# Allegro board 980K2-260817_261117.brd
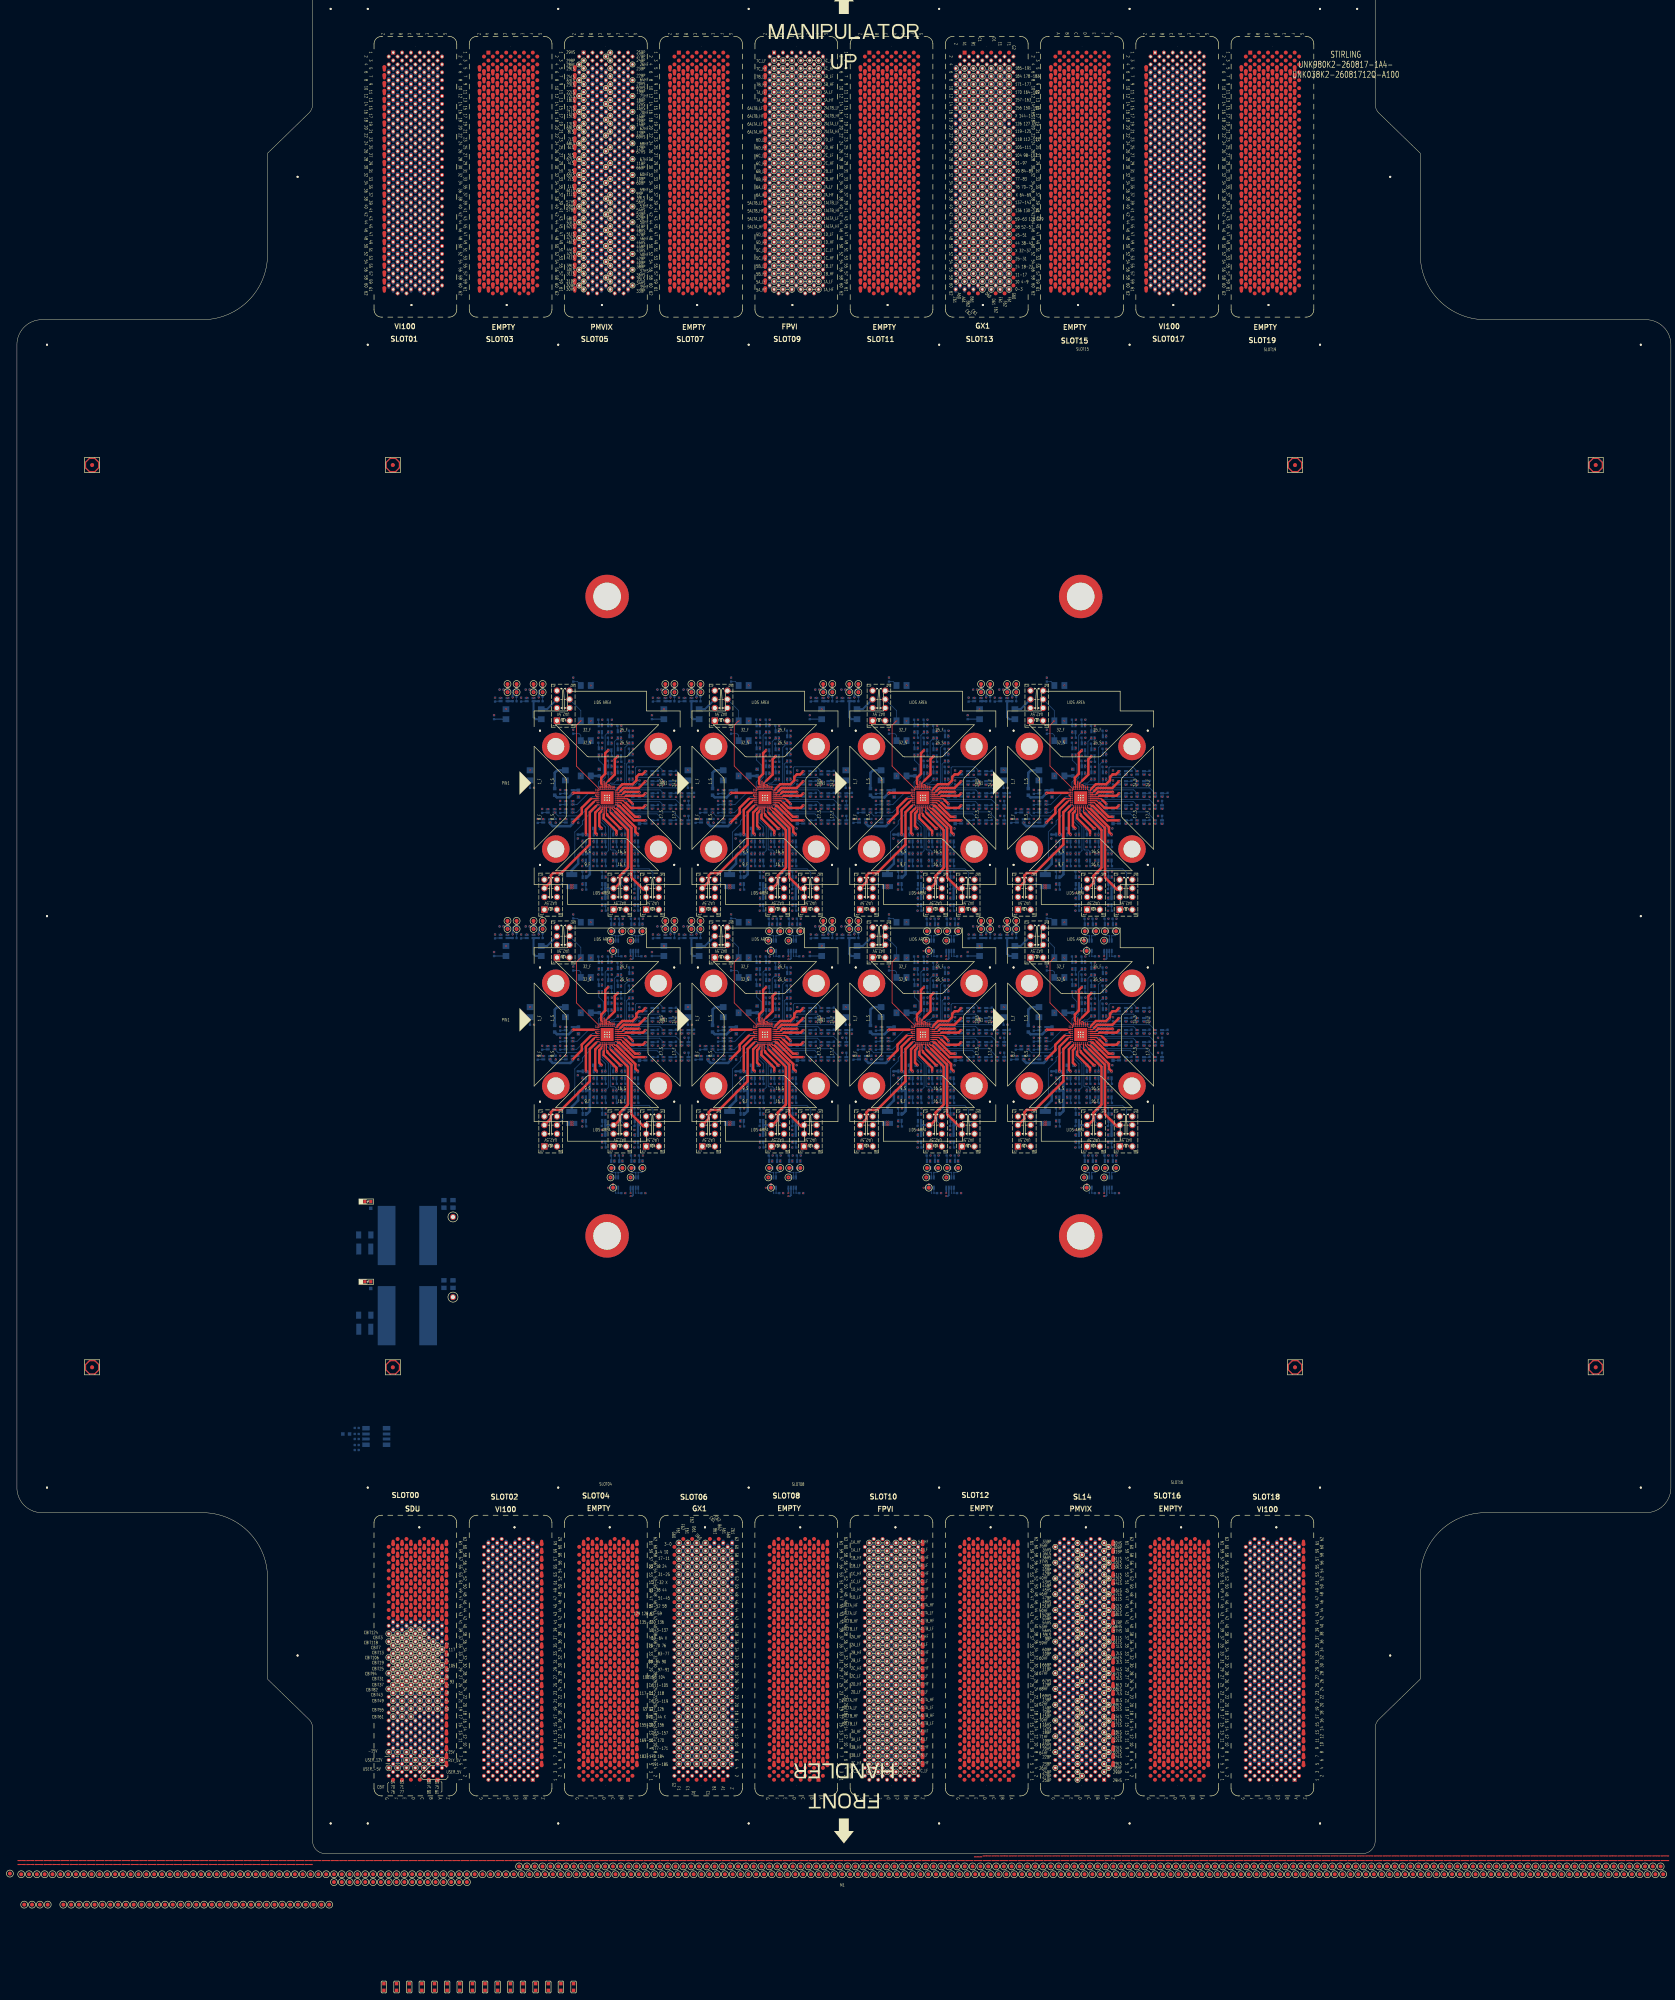
[diagram p0: board, top side]
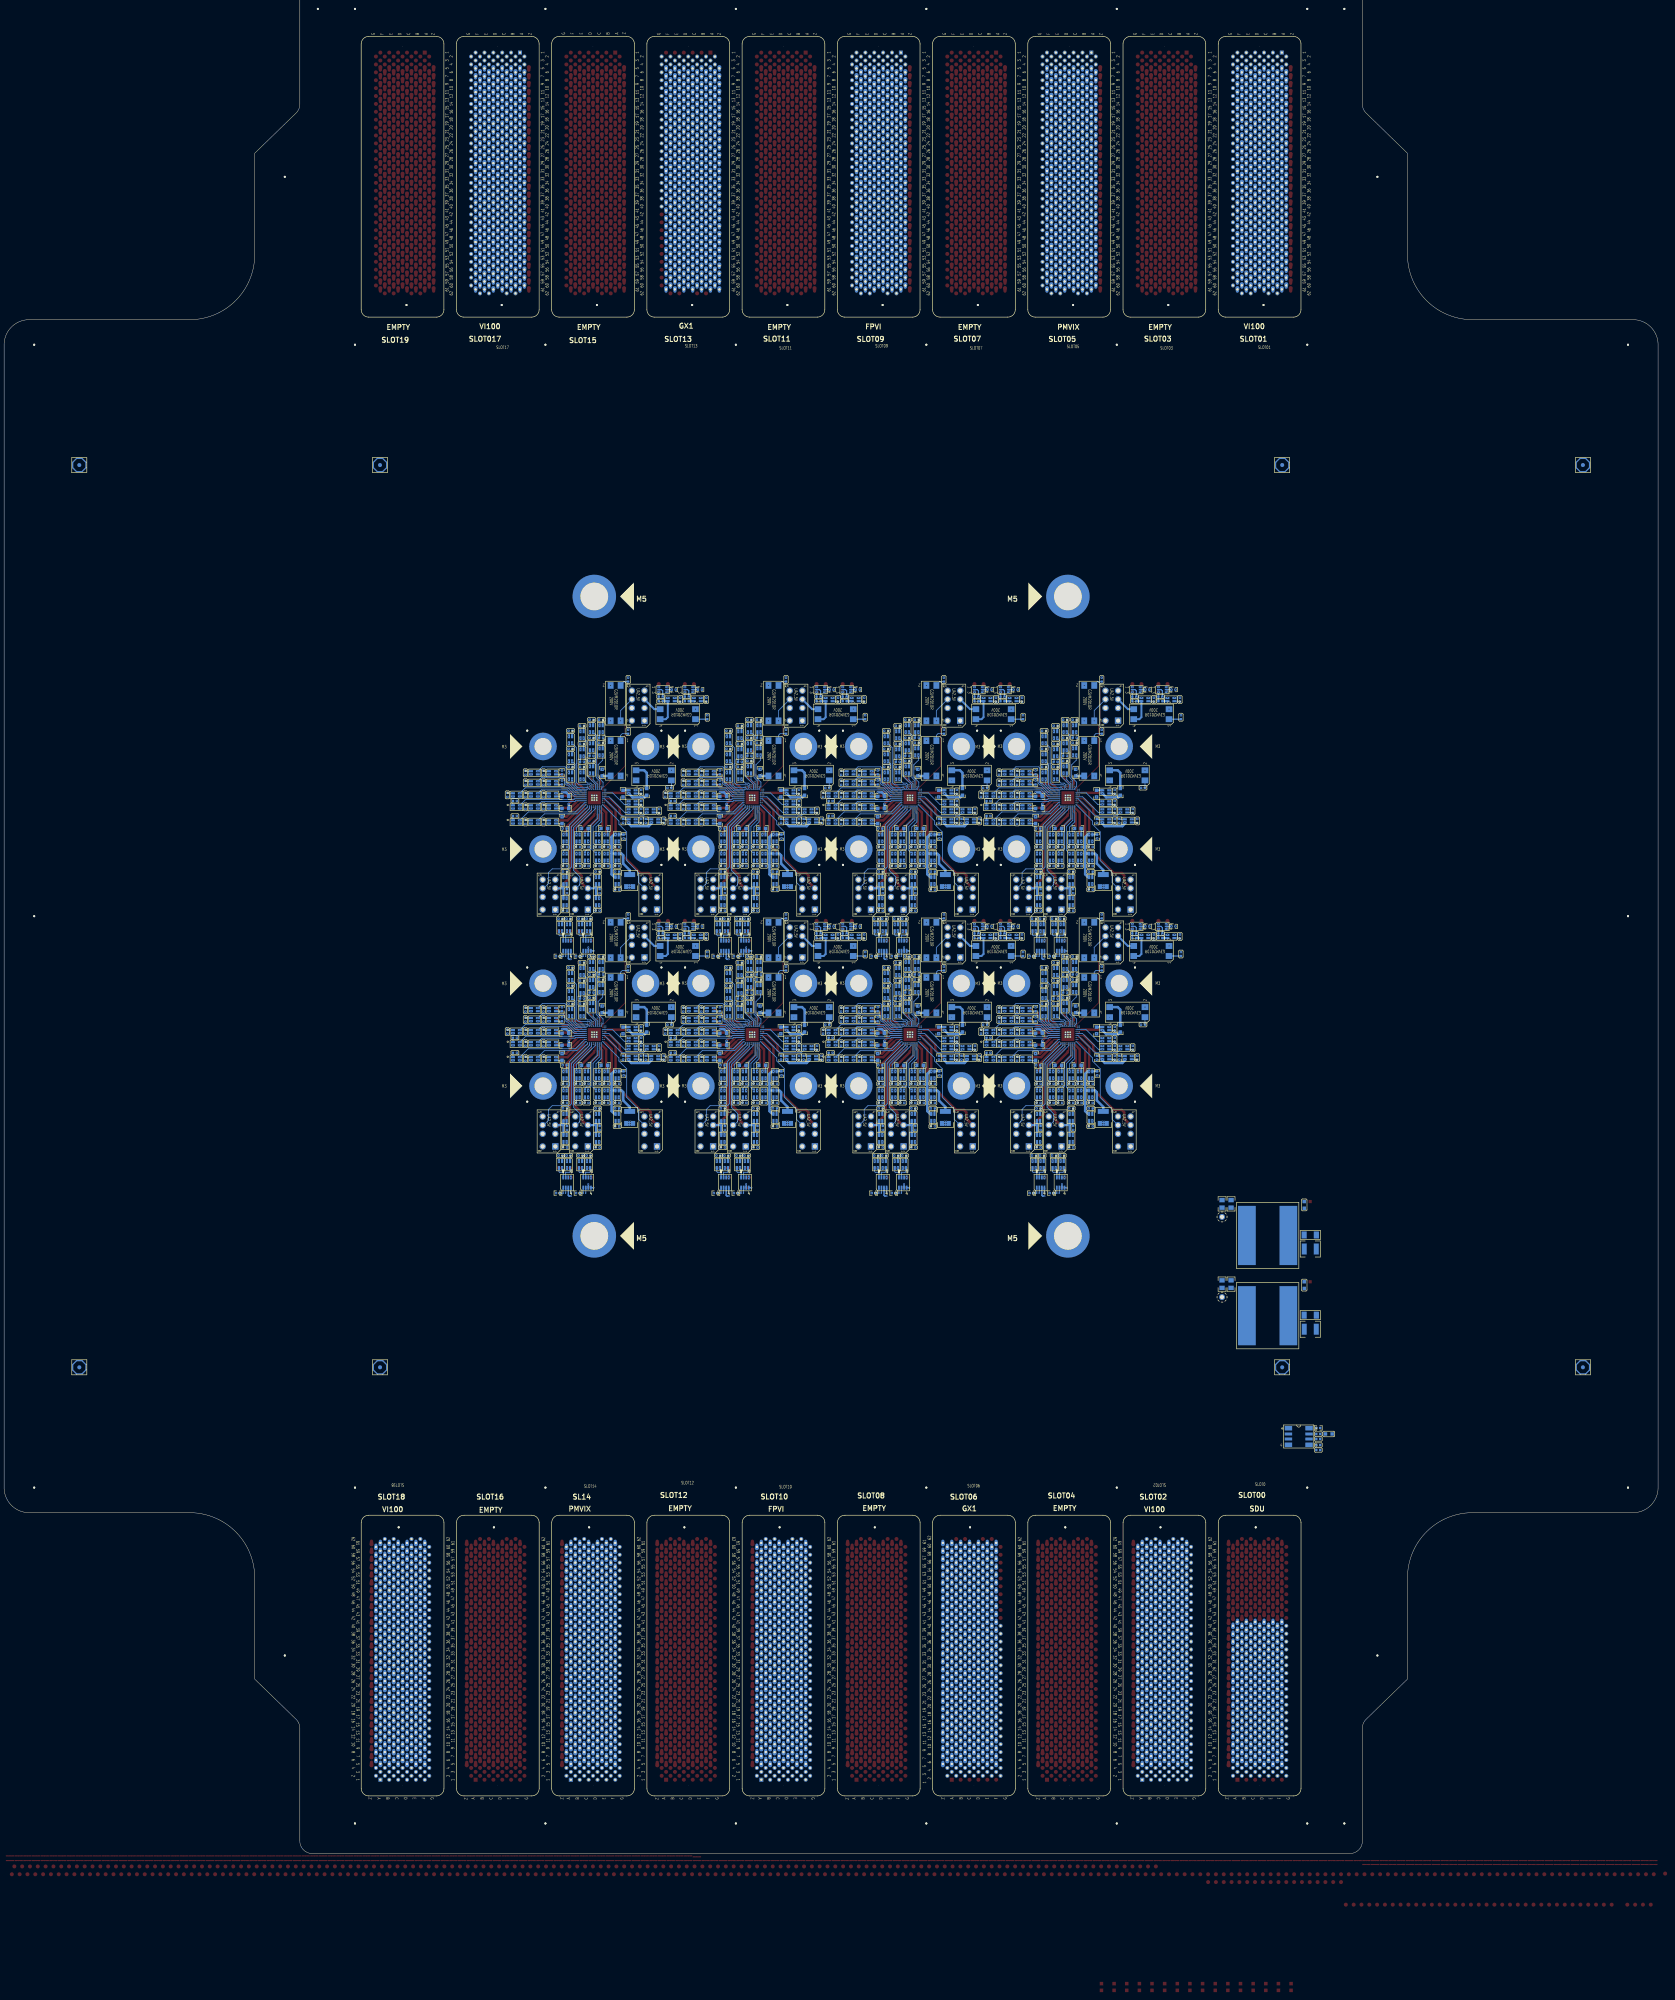
[diagram p1: board, bottom side, seen from below]

Outline 419.1 x 474.98 mm; copper layers: TOP, L02_GND, L03_DP, L04_GND, L05_DP, L06_GND, L07_VI, L08_GND, L09_VI, L10_GND, L11_VI, L12_GND, L13_VI, L14_GND, L15_5V, L16_5V, L17_C-BIT, L18_C-BIT, L19_GND, L20_VI, L21_GND, L22_VI, L23_GND, L24_VI, L25_GND, L26_VI, L27_GND, L28_DP, L29_GND, L30_DP, L31_GND, BOTTOM. Coordinates in mm from the lower left corner of the outline.

## Placement (name value [footprint] x y rotation side)
BC9  0.1U-50-X-S4-TDK  [C0402]  86.11 107.82 180 bottom
BR5  1K-1-S4  [R0402]  86.11 106.3 0 bottom
BR6  1K-1-S4  [R0402]  86.11 103.5 0 bottom
BR7  0-5-S6  [R0603]  83.44 106.3 180 bottom
BR8  0-5-S4  [R0402]  86.11 105.03 180 bottom
BR9  0-5-S4  [R0402]  86.11 102.24 180 bottom
BU1  AT24C512C-SSHM-T-SOIC8  [SO8_206X127MM]  91.06 105.66 180 bottom
C48  0.01U-100-X7R-S6-MU  [C0603]  147.57 273.87 90 bottom
C49  0.01U-100-X7R-S6-MU  [C0603]  136.27 268.99 270 bottom
C50  0.01U-100-X7R-S6-MU  [C0603]  142.28 268.54 270 bottom
C53  1U-16-X5R-S4-YA  [C0402]  142.24 261.62 270 bottom
C54  2.2U-16-X-S4-MU  [C0402]  136.53 261.62 270 bottom
C58  1U-16-X5R-S4-YA  [C0402]  142.11 257.68 270 bottom
C59  4.7U-100-X-SB-MU  [C1210]  140.59 246.51 270 bottom
C60  0.01U-100-X7R-S6-MU  [C0603]  147.01 259.72 0 bottom
C61  0.01U-100-X7R-S6-MU  [C0603]  156.88 264.78 180 bottom
C62  2.2U-16-X-S4-MU  [C0402]  157.07 259.72 0 bottom
C63  0.01U-100-X7R-S6-MU  [C0603]  157.73 261.82 90 bottom
C64  0.01U-100-X7R-S6-MU  [C0603]  156.88 267.82 180 bottom
C65  0.1U-25-X7R-S4-MU  [C0402]  157.73 271.37 90 bottom
C66  0.1U-25-X7R-S4-MU  [C0402]  152.65 276.61 180 bottom
C67  0.1U-25-X7R-S4-MU  [C0402]  150.24 278.13 180 bottom
C68  0.1U-25-X7R-S4-MU  [C0402]  147.83 282.7 180 bottom
C69  0.01U-100-X7R-S6-MU  [C0603]  151.96 259.72 0 bottom
C70  0.1U-25-X7R-S4-MU  [C0402]  122.8 294.89 180 bottom
C71  0.1U-25-X7R-S4-MU  [C0402]  129.42 294.89 180 bottom
C72  0.1U-25-X7R-S4-MU  [C0402]  158.75 227.33 0 bottom
C73  0.1U-25-X7R-S4-MU  [C0402]  153.67 227.33 0 bottom
C74  0.1U-25-X7R-S4-MU  [C0402]  157.73 273.91 90 bottom
CT1  47U-16-X5R-SB-MU  [C1210]  88.14 153.16 180 bottom
CT2  10U-16-X5R-S8-TY  [C0805]  108.2 164.59 90 bottom
CT3  22U-16-X-S8-MU  [C0805]  110.49 164.59 90 bottom
CT7  47U-16-X5R-SB-MU  [C1210]  88.14 132.84 180 bottom
CT8  10U-16-X5R-S8-TY  [C0805]  110.49 144.27 90 bottom
CT9  22U-16-X-S8-MU  [C0805]  108.2 144.27 90 bottom
F1  C1F8-0.25A-SA  [FUSE_1206_H1P05MM]  88.14 156.72 0 bottom
F2  C1F8-0.25A-SA  [FUSE_1206_H1P05MM]  88.14 136.4 0 bottom
FD1  -  [FD_040_V2]  95.25 123.19 0 top
FD2  -  [FD_040_V2]  323.85 123.19 0 top
FD3  -  [FD_040_V2]  323.85 351.79 0 top
FD4  -  [FD_040_V2]  95.25 351.79 0 top
FD5  -  [FD_040_V2]  323.85 123.19 180 bottom
FD6  -  [FD_040_V2]  95.25 123.19 180 bottom
FD7  -  [FD_040_V2]  95.25 351.79 180 bottom
FD8  -  [FD_040_V2]  323.85 351.79 180 bottom
FD9  -  [FD_040_V2]  19.05 123.19 0 top
FD10  -  [FD_040_V2]  400.05 123.19 0 top
FD11  -  [FD_040_V2]  400.05 351.79 0 top
FD12  -  [FD_040_V2]  19.05 351.79 0 top
FD13  -  [FD_040_V2]  400.05 123.19 180 bottom
FD14  -  [FD_040_V2]  19.05 123.19 180 bottom
FD15  -  [FD_040_V2]  19.05 351.79 180 bottom
FD16  -  [FD_040_V2]  400.05 351.79 180 bottom
K1  UA2-5NJ-A-V3  [RL_NECUA2_5V_V3]  138.43 290.63 270 bottom
K2  G3VM-201DR  [RL_G3VM201DR_200V]  144.15 277.5 0 bottom
K3  G3VM-201DR  [RL_G3VM201DR_200V]  134.49 273.18 90 bottom
K4  G3VM-201DR  [RL_G3VM201DR_200V]  144.15 291.47 0 bottom
K5  G3VM-51UR-5V-VSON4  [RL_G3VM_4P_VSON4]  139.95 268.99 0 bottom
K6  G3VM-51UR-5V-VSON4  [RL_G3VM_4P_VSON4]  139.95 266.19 0 bottom
K7  G3VM-51UR-5V-VSON4  [RL_G3VM_4P_VSON4]  139.95 264.16 0 bottom
K8  G3VM-51UR-5V-VSON4  [RL_G3VM_4P_VSON4]  139.95 261.62 0 bottom
K9  G3VM-51UR-5V-VSON4  [RL_G3VM_4P_VSON4]  134.24 261.62 0 bottom
K10  G3VM-51UR-5V-VSON4  [RL_G3VM_4P_VSON4]  135.38 264.16 0 bottom
K11  G3VM-51UR-5V-VSON4  [RL_G3VM_4P_VSON4]  143.76 257.3 90 bottom
K12  G3VM-51UR-5V-VSON4  [RL_G3VM_4P_VSON4]  143.76 252.48 90 bottom
K13  G3VM-51UR-5V-VSON4  [RL_G3VM_4P_VSON4]  143.76 246.51 90 bottom
K14  G3VM-51UR-5V-VSON4  [RL_G3VM_4P_VSON4]  146.56 252.48 90 bottom
K15  UA2-5NJ-A-V3  [RL_NECUA2_5V_V3]  135.25 242.75 270 bottom
K16  G3VM-51UR-5V-VSON4  [RL_G3VM_4P_VSON4]  146.56 257.3 90 bottom
K17  G3VM-51UR-5V-VSON4  [RL_G3VM_4P_VSON4]  148.72 257.3 90 bottom
K18  G3VM-51UR-5V-VSON4  [RL_G3VM_4P_VSON4]  148.72 252.48 90 bottom
K19  G3VM-51UR-5V-VSON4  [RL_G3VM_4P_VSON4]  151.51 257.3 90 bottom
K20  G3VM-51UR-5V-VSON4  [RL_G3VM_4P_VSON4]  151.51 252.48 90 bottom
K21  G3VM-51UR-5V-VSON4  [RL_G3VM_4P_VSON4]  153.67 257.3 90 bottom
K22  G3VM-51UR-5V-VSON4  [RL_G3VM_4P_VSON4]  153.67 252.48 90 bottom
K23  UA2-5NJ-A-V3  [RL_NECUA2_5V_V3]  152.78 242.75 270 bottom
K24  UA2-5NJ-A-V3  [RL_NECUA2_5V_V3]  161.04 242.75 270 bottom
K25  G3VM-51UR-5V-VSON4  [RL_G3VM_4P_VSON4]  156.97 257.3 90 bottom
K26  G3VM-51UR-5V-VSON4  [RL_G3VM_4P_VSON4]  156.97 252.48 90 bottom
K27  G3VM-51UR-5V-VSON4  [RL_G3VM_4P_VSON4]  160.15 261.37 180 bottom
K28  G3VM-51UR-5V-VSON4  [RL_G3VM_4P_VSON4]  164.72 261.37 180 bottom
K29  G3VM-51UR-5V-VSON4  [RL_G3VM_4P_VSON4]  169.29 261.37 180 bottom
K30  G3VM-51UR-5V-VSON4  [RL_G3VM_4P_VSON4]  160.15 265.18 180 bottom
K31  G3VM-51UR-5V-VSON4  [RL_G3VM_4P_VSON4]  164.72 265.18 180 bottom
K32  G3VM-51UR-5V-VSON4  [RL_G3VM_4P_VSON4]  169.29 265.18 180 bottom
K33  G3VM-51UR-5V-VSON4  [RL_G3VM_4P_VSON4]  160.15 268.22 180 bottom
K34  G3VM-51UR-5V-VSON4  [RL_G3VM_4P_VSON4]  164.72 268.22 180 bottom
K35  G3VM-51UR-5V-VSON4  [RL_G3VM_4P_VSON4]  169.29 268.22 180 bottom
K36  G3VM-51UR-5V-VSON4  [RL_G3VM_4P_VSON4]  160.15 271.27 180 bottom
K37  G3VM-51UR-5V-VSON4  [RL_G3VM_4P_VSON4]  164.72 271.27 180 bottom
K38  G3VM-51UR-5V-VSON4  [RL_G3VM_4P_VSON4]  160.15 273.81 180 bottom
K39  G3VM-51UR-5V-VSON4  [RL_G3VM_4P_VSON4]  164.72 273.81 180 bottom
K40  G3VM-51UR-5V-VSON4  [RL_G3VM_4P_VSON4]  155.58 273.05 270 bottom
K41  G3VM-51UR-5V-VSON4  [RL_G3VM_4P_VSON4]  155.58 277.62 270 bottom
K42  G3VM-51UR-5V-VSON4  [RL_G3VM_4P_VSON4]  155.58 282.19 270 bottom
K43  G3VM-51UR-5V-VSON4  [RL_G3VM_4P_VSON4]  152.65 273.05 270 bottom
K44  G3VM-51UR-5V-VSON4  [RL_G3VM_4P_VSON4]  152.65 278.89 270 bottom
K45  G3VM-51UR-5V-VSON4  [RL_G3VM_4P_VSON4]  152.65 283.46 270 bottom
K46  G3VM-51UR-5V-VSON4  [RL_G3VM_4P_VSON4]  150.24 274.57 270 bottom
K47  G3VM-51UR-5V-VSON4  [RL_G3VM_4P_VSON4]  150.24 280.42 270 bottom
K48  G3VM-51UR-5V-VSON4  [RL_G3VM_4P_VSON4]  150.24 284.99 270 bottom
K49  G3VM-51UR-5V-VSON4  [RL_G3VM_4P_VSON4]  147.83 284.99 270 bottom
K50  G3VM-51UR-5V-VSON4  [RL_G3VM_4P_VSON4]  147.83 279.15 270 bottom
K51  G3VM-51UR-5V-VSON4  [RL_G3VM_4P_VSON4]  148.72 246.51 270 bottom
K52  G3VM-51UR-5V-VSON4  [RL_G3VM_4P_VSON4]  148.72 241.17 90 bottom
K53  G3VM-51UR-5V-VSON4  [RL_G3VM_4P_VSON4]  156.97 246.51 270 bottom
K54  G3VM-51UR-5V-VSON4  [RL_G3VM_4P_VSON4]  156.97 241.17 90 bottom
K55  G3VM-51UR-5V-VSON4  [RL_G3VM_4P_VSON4]  123.44 292.35 0 bottom
K56  G3VM-201DR  [RL_G3VM201DR_200V]  128.4 288.67 90 bottom
K57  G3VM-51UR-5V-VSON4  [RL_G3VM_4P_VSON4]  158.12 234.57 270 bottom
K58  G3VM-51UR-5V-VSON4  [RL_G3VM_4P_VSON4]  156.08 234.57 270 bottom
K59  G3VM-51UR-5V-VSON4  [RL_G3VM_4P_VSON4]  153.04 234.57 270 bottom
K60  G3VM-51UR-5V-VSON4  [RL_G3VM_4P_VSON4]  151 234.57 270 bottom
K61  G3VM-51UR-5V-VSON4  [RL_G3VM_4P_VSON4]  130.05 292.35 0 bottom
LD1  LDG-2-S6  [LED_0603]  88.91 165.19 0 top
LD3  LDG-2-S6  [LED_0603]  88.91 144.87 0 top
LT1  L10U-16A-S16.5X15.5-PU  [IND_16P5X15P5MM]  98.93 156.59 0 bottom
LT3  L10U-16A-S16.5X15.5-PU  [IND_16P5X15P5MM]  98.93 136.27 0 bottom
M1  PG_LTXDX_F_X1_OUTLINE_TD_V2  [PG_LTXDX_F_X1_OUTLINE_TD_COHU]  209.55 237.49 0 top
NOREF  -  []  221.55 262.57 90 top
NOREF#2  -  []  175.84 262.57 90 top
NOREF#3  -  []  276.52 216.55 0 top
NOREF#4  -  []  267.45 269.24 0 top
NOREF#5  -  []  89.74 135.6 90 top
NOREF#6  -  []  138.56 246.51 0 top
NOREF#7  -  []  229.72 215.77 0 top
NOREF#8  -  []  186.16 272.17 90 top
NOREF#9  -  []  209.52 207.27 90 top
NOREF#10  -  []  293.99 17.15 90 top
NOREF#11  -  []  168.54 265.9 0 top
NOREF#12  -  []  89.76 164.74 90 top
NOREF#13  -  []  147.12 276.42 0 top
NOREF#14  -  []  240.23 176.17 90 top
NOREF#15  -  []  236.7 193.03 90 top
NOREF#16  -  []  130.92 291.95 90 top
NOREF#17  -  []  248.54 262.09 0 top
NOREF#18  -  []  244.44 232.28 90 top
NOREF#19  -  []  161.75 266.13 0 top
NOREF#20  -  []  229.84 224.11 90 top
NOREF#21  -  []  204.32 291.95 90 top
NOREF#22  -  []  156.57 182.05 0 top
NOREF#23  -  []  186.83 191.93 0 top
NOREF#24  -  []  260.59 244.98 90 top
NOREF#25  -  []  159.4 208.95 0 top
NOREF#26  -  []  153.76 195.7 90 top
NOREF#27  -  []  266.83 256.75 0 top
NOREF#28  -  []  191.24 253.03 90 top
NOREF#29  -  []  260.83 208.59 90 top
NOREF#30  -  []  196.02 197.6 0 top
NOREF#31  -  []  189.84 279.54 90 top
NOREF#32  -  []  272.13 284.66 0 top
NOREF#33  -  []  142.88 273.02 0 top
NOREF#34  -  []  178.35 271.84 0 top
NOREF#35  -  []  248.42 268.62 0 top
NOREF#36  -  []  209.55 237.49 90 top
NOREF#37  -  []  163.84 213.41 90 top
NOREF#38  -  []  230.41 168.7 90 top
NOREF#39  -  []  191.95 238.07 0 top
NOREF#40  -  []  283.84 267.82 90 top
NOREF#41  -  []  229.72 286.19 0 top
NOREF#42  -  []  234.39 222.02 90 top
NOREF#43  -  []  243.84 270.87 90 top
NOREF#44  -  []  199.4 264.45 90 top
NOREF#45  -  []  229.12 180.3 90 top
NOREF#46  -  []  255.84 262.57 90 top
NOREF#47  -  []  229.55 188.99 90 top
NOREF#48  -  []  283.97 270.55 90 top
NOREF#49  -  []  188.78 222.65 0 top
NOREF#50  -  []  150.77 223.79 90 top
NOREF#51  -  []  239.27 271.67 0 top
NOREF#52  -  []  260.83 263.76 90 top
NOREF#53  -  []  157.37 191.6 90 top
NOREF#54  -  []  216.55 194.49 90 top
NOREF#55  -  []  264.04 245.96 0 top
NOREF#56  -  []  203.84 270.87 90 top
NOREF#57  -  []  213.65 239.15 0 top
NOREF#58  -  []  133.1 237.5 0 top
NOREF#59  -  []  264.16 251.6 90 top
NOREF#60  -  []  275.92 250.88 90 top
NOREF#61  -  []  216.83 227.03 0 top
NOREF#62  -  []  231.11 260.17 90 top
NOREF#63  -  []  159.4 202.09 0 top
NOREF#64  -  []  204.95 200.42 90 top
NOREF#65  -  []  133.45 244.35 0 top
NOREF#66  -  []  249.49 220.89 0 top
NOREF#67  -  []  271.98 280.75 90 top
NOREF#68  -  []  148.78 222.65 0 top
NOREF#69  -  []  155.05 218.82 0 top
NOREF#70  -  []  231.24 253.03 90 top
NOREF#71  -  []  163.84 265.58 0 top
NOREF#72  -  []  187.77 197.6 0 top
NOREF#73  -  []  179.55 294.49 0 top
NOREF#74  -  []  177.29 247.78 0 top
NOREF#75  -  []  197.25 196.75 0 top
NOREF#76  -  []  187.3 286.19 0 top
NOREF#77  -  []  142.81 252.5 0 top
NOREF#78  -  []  229.84 284.11 90 top
NOREF#79  -  []  279.4 208.95 0 top
NOREF#80  -  []  235.68 173.69 90 top
NOREF#81  -  []  205.04 293.3 90 top
NOREF#82  -  []  190.41 228.7 90 top
NOREF#83  -  []  241.75 209.17 0 top
NOREF#84  -  []  237.25 196.75 0 top
NOREF#85  -  []  236.45 187.71 0 top
NOREF#86  -  []  224.04 191.93 0 top
NOREF#87  -  []  279.4 204.45 90 top
NOREF#88  -  []  236.57 193.35 0 top
NOREF#89  -  []  227.8 269.99 0 top
NOREF#90  -  []  237.59 235.77 0 top
NOREF#91  -  []  188.44 257.85 90 top
NOREF#92  -  []  226.16 260.17 90 top
NOREF#93  -  []  149.84 224.11 90 top
NOREF#94  -  []  264.16 185.63 90 top
NOREF#95  -  []  179.08 265.79 0 top
NOREF#96  -  []  89.74 135.6 0 top
NOREF#97  -  []  202.2 238.35 0 top
NOREF#98  -  []  239.27 210.87 90 top
NOREF#99  -  []  148.78 244.35 0 top
NOREF#100  -  []  162.57 291.95 0 top
NOREF#101  -  []  186.43 282.49 90 top
NOREF#102  -  []  228.95 266.89 0 top
NOREF#103  -  []  255.11 201.22 90 top
NOREF#104  -  []  233.18 217.69 90 top
NOREF#105  -  []  152.13 220.09 0 top
NOREF#106  -  []  187.77 192.78 0 top
NOREF#107  -  []  188.81 195.7 90 top
NOREF#108  -  []  290.89 202.32 0 top
NOREF#109  -  []  164.95 264.23 90 top
NOREF#110  -  []  239.72 219.22 90 top
NOREF#111  -  []  243.92 289.94 0 top
NOREF#112  -  []  226.16 212.17 90 top
NOREF#113  -  []  106.68 148.34 0 top
NOREF#114  -  []  197.5 245.31 90 top
NOREF#115  -  []  153.6 222.39 0 top
NOREF#116  -  []  184.16 185.63 90 top
NOREF#117  -  []  209.49 280.89 0 top
NOREF#118  -  []  206.32 266.13 0 top
NOREF#119  -  []  235.17 281.32 90 top
NOREF#120  -  []  152.13 224.66 0 top
NOREF#121  -  []  288.42 204.78 90 top
NOREF#122  -  []  163.97 205.9 0 top
NOREF#123  -  []  225.61 257.6 0 top
NOREF#124  -  []  149.29 279.37 0 top
NOREF#125  -  []  271.53 173.37 90 top
NOREF#126  -  []  119.48 456.29 90 top
NOREF#127  -  []  276.33 227.9 90 top
NOREF#128  -  []  129.17 291.95 0 top
NOREF#129  -  []  268.81 250.88 90 top
NOREF#130  -  []  135.15 268.04 90 top
NOREF#131  -  []  232.72 197.6 0 top
NOREF#132  -  []  195.05 278.82 0 top
NOREF#133  -  []  183.36 253.35 0 top
NOREF#134  -  []  203.84 210.87 90 top
NOREF#135  -  []  258.35 267.01 0 top
NOREF#136  -  []  267.99 178.35 0 top
NOREF#137  -  []  209.52 270.32 90 top
NOREF#138  -  []  236.33 227.9 90 top
NOREF#139  -  []  196.81 172.54 0 top
NOREF#140  -  []  159.27 271.67 0 top
NOREF#141  -  []  266.16 258.18 0 top
NOREF#142  -  []  201.75 212.22 0 top
NOREF#143  -  []  248.54 200.64 90 top
NOREF#144  -  []  140.83 203.76 90 top
NOREF#145  -  []  220.83 201.22 90 top
NOREF#146  -  []  243.84 208.62 0 top
NOREF#147  -  []  318.12 17.15 0 top
NOREF#148  -  []  279.65 272.56 0 top
NOREF#149  -  []  216.38 264.09 90 top
NOREF#150  -  []  194.39 222.02 90 top
NOREF#151  -  []  273.94 256.75 0 top
NOREF#152  -  []  270.56 192.78 0 top
NOREF#153  -  []  173.36 261.22 0 top
NOREF#154  -  []  184.04 245.96 0 top
NOREF#155  -  []  147.99 178.35 0 top
NOREF#156  -  []  219.08 205.79 0 top
NOREF#157  -  []  257.25 236.5 90 top
NOREF#158  -  []  131.22 294.89 90 top
NOREF#159  -  []  89.76 165.64 0 top
NOREF#160  -  []  156.81 232.54 0 top
NOREF#161  -  []  174.34 82.65 0 top
NOREF#162  -  []  266.16 226.14 90 top
NOREF#163  -  []  193.95 191.93 0 top
NOREF#164  -  []  243.97 270.55 90 top
NOREF#165  -  []  150.56 192.78 0 top
NOREF#166  -  []  136.55 254.49 90 top
NOREF#167  -  []  174.07 210.89 90 top
NOREF#168  -  []  163.97 212 0 top
NOREF#169  -  []  243.97 212 0 top
NOREF#170  -  []  238.91 232.21 90 top
NOREF#171  -  []  147.8 269.99 0 top
NOREF#172  -  []  196.79 171.3 0 top
NOREF#173  -  []  188.99 180.62 0 top
NOREF#174  -  []  195.96 228.6 90 top
NOREF#175  -  []  209.55 237.49 90 top
NOREF#176  -  []  164.95 200.42 90 top
NOREF#177  -  []  171.05 245.49 90 top
NOREF#178  -  []  268.99 256.75 0 top
NOREF#179  -  []  106.83 127.87 90 top
NOREF#180  -  []  271.95 238.07 0 top
NOREF#181  -  []  276.57 185.63 0 top
NOREF#182  -  []  268.78 282.65 0 top
NOREF#183  -  []  149.72 275.77 0 top
NOREF#184  -  []  235.96 228.6 90 top
NOREF#185  -  []  277.18 236.17 90 top
NOREF#186  -  []  140.95 206.12 90 top
NOREF#187  -  []  224.04 251.93 0 top
NOREF#188  -  []  155.17 221.32 90 top
NOREF#189  -  []  211.65 233.3 90 top
NOREF#190  -  []  146.88 289.79 0 top
NOREF#191  -  []  265.42 274.72 90 top
NOREF#192  -  []  135.15 265.24 90 top
NOREF#193  -  []  159.22 195.7 90 top
NOREF#194  -  []  236.81 172.54 0 top
NOREF#195  -  []  267.8 209.99 0 top
NOREF#196  -  []  254.07 270.89 90 top
NOREF#197  -  []  208.42 200.97 90 top
NOREF#198  -  []  124.32 231.95 90 top
NOREF#199  -  []  266.43 236.47 90 top
NOREF#200  -  []  248.54 268.95 0 top
NOREF#201  -  []  216.63 232.23 0 top
NOREF#202  -  []  241.75 214.76 0 top
NOREF#203  -  []  214.43 232.23 0 top
NOREF#204  -  []  149.55 156.49 90 top
NOREF#205  -  []  154.63 279.22 90 top
NOREF#206  -  []  286.32 214.76 0 top
NOREF#207  -  []  246.32 214.76 0 top
NOREF#208  -  []  125.08 17.15 0 top
NOREF#209  -  []  201.75 262.32 0 top
NOREF#210  -  []  173.62 289.09 90 top
NOREF#211  -  []  195.58 202.67 90 top
NOREF#212  -  []  214.09 204.23 90 top
NOREF#213  -  []  225.09 257.49 90 top
NOREF#214  -  []  199.06 238.07 0 top
NOREF#215  -  []  187.8 205.39 90 top
NOREF#216  -  []  209.52 267.27 90 top
NOREF#217  -  []  172.37 392.33 90 top
NOREF#218  -  []  216.26 263.76 90 top
NOREF#219  -  []  227.77 192.78 0 top
NOREF#220  -  []  231.98 226.59 90 top
NOREF#221  -  []  181.55 205.11 90 top
NOREF#222  -  []  209.55 237.49 90 top
NOREF#223  -  []  236.7 197.85 90 top
NOREF#224  -  []  189.84 224.11 90 top
NOREF#225  -  []  179.08 263.76 0 top
NOREF#226  -  []  233.6 276.55 0 top
NOREF#227  -  []  88.16 144.87 0 top
NOREF#228  -  []  221.03 267.69 90 top
NOREF#229  -  []  276.1 280.99 90 top
NOREF#230  -  []  173.24 201.55 0 top
NOREF#231  -  []  259.08 203.76 0 top
NOREF#232  -  []  254.09 267.27 90 top
NOREF#233  -  []  317.15 392.33 90 top
NOREF#234  -  []  193.27 258.18 0 top
NOREF#235  -  []  136.26 263.76 90 top
NOREF#236  -  []  227.45 209.24 0 top
NOREF#237  -  []  199.27 265.58 0 top
NOREF#238  -  []  253.24 201.55 0 top
NOREF#239  -  []  140.83 261.22 90 top
NOREF#240  -  []  199.65 212.56 0 top
NOREF#241  -  []  163.97 272 0 top
NOREF#242  -  []  261.55 202.57 90 top
NOREF#243  -  []  134.07 210.89 90 top
NOREF#244  -  []  149.55 318.49 0 top
NOREF#245  -  []  272.66 226.35 90 top
NOREF#246  -  []  196.54 167 0 top
NOREF#247  -  []  241.84 295.2 0 top
NOREF#248  -  []  149.12 191.6 90 top
NOREF#249  -  []  188.44 181.72 90 top
NOREF#250  -  []  184.16 251.6 90 top
NOREF#251  -  []  271.91 191.6 90 top
NOREF#252  -  []  265.09 197.49 90 top
NOREF#253  -  []  149.72 221.62 0 top
NOREF#254  -  []  239.27 208.62 0 top
NOREF#255  -  []  231.95 178.07 0 top
NOREF#256  -  []  188.35 277.95 90 top
NOREF#257  -  []  199.44 179.15 0 top
NOREF#258  -  []  272.72 192.78 0 top
NOREF#259  -  []  259.72 213.6 90 top
NOREF#260  -  []  140.95 201.55 90 top
NOREF#261  -  []  197.37 240.3 90 top
NOREF#262  -  []  152.13 274.25 0 top
NOREF#263  -  []  268.32 185.63 90 top
NOREF#264  -  []  275.56 235.77 0 top
NOREF#265  -  []  236.1 271.85 90 top
NOREF#266  -  []  242.26 176.17 90 top
NOREF#267  -  []  183.36 258.18 0 top
NOREF#268  -  []  144.71 241.71 90 top
NOREF#269  -  []  255.11 261.22 90 top
NOREF#270  -  []  147.77 197.6 0 top
NOREF#271  -  []  196.02 252.78 0 top
NOREF#272  -  []  156.02 247.68 0 top
NOREF#273  -  []  171.65 233.3 90 top
NOREF#274  -  []  266.96 196.43 90 top
NOREF#275  -  []  219.08 268.59 0 top
NOREF#276  -  []  228.99 240.62 0 top
NOREF#277  -  []  196.57 185.63 0 top
NOREF#278  -  []  196.84 167.33 0 top
NOREF#279  -  []  140.83 205.79 90 top
NOREF#280  -  []  277.25 180.62 0 top
NOREF#281  -  []  272.25 272.17 0 top
NOREF#282  -  []  150.15 206.89 90 top
NOREF#283  -  []  226.96 196.43 90 top
NOREF#284  -  []  204.44 232.28 90 top
NOREF#285  -  []  211.05 245.49 90 top
NOREF#286  -  []  150.6 233.69 90 top
NOREF#287  -  []  279.22 255.7 90 top
NOREF#288  -  []  155.96 168.6 90 top
NOREF#289  -  []  231.76 167.33 0 top
NOREF#290  -  []  289.52 210.32 90 top
NOREF#291  -  []  156.1 280.99 90 top
NOREF#292  -  []  239.4 272 0 top
NOREF#293  -  []  216.26 203.76 90 top
NOREF#294  -  []  168.42 267.82 90 top
NOREF#295  -  []  273.18 222.26 90 top
NOREF#296  -  []  236.79 171.3 0 top
NOREF#297  -  []  171.05 229.49 0 top
NOREF#298  -  []  187.8 264.99 90 top
NOREF#299  -  []  235.26 83.81 0 top
NOREF#300  -  []  187.43 284.11 90 top
NOREF#301  -  []  180.95 264.09 90 top
NOREF#302  -  []  241.44 184.35 0 top
NOREF#303  -  []  231.19 218.07 0 top
NOREF#304  -  []  164.95 207.27 90 top
NOREF#305  -  []  89.76 144.42 90 top
NOREF#306  -  []  246.73 82.65 0 top
NOREF#307  -  []  276.1 220.99 90 top
NOREF#308  -  []  183.89 245.24 90 top
NOREF#309  -  []  169.52 270.32 90 top
NOREF#310  -  []  226.7 223.05 90 top
NOREF#311  -  []  269.84 279.54 90 top
NOREF#312  -  []  244.95 207.27 90 top
NOREF#313  -  []  277.04 244.35 0 top
NOREF#314  -  []  170.89 209.17 0 top
NOREF#315  -  []  157.37 240.3 90 top
NOREF#316  -  []  279.06 238.07 0 top
NOREF#317  -  []  192.25 218.02 0 top
NOREF#318  -  []  266.16 253.35 0 top
NOREF#319  -  []  191.91 251.6 90 top
NOREF#320  -  []  154.33 207.37 90 top
NOREF#321  -  []  151.98 226.59 90 top
NOREF#322  -  []  244.95 260.42 90 top
NOREF#323  -  []  123.92 289.94 0 top
NOREF#324  -  []  183.49 257.85 90 top
NOREF#325  -  []  168.54 208.95 0 top
NOREF#326  -  []  263.36 258.18 0 top
NOREF#327  -  []  251.25 184.35 0 top
NOREF#328  -  []  140.83 201.22 90 top
NOREF#329  -  []  252.55 190.49 90 top
NOREF#330  -  []  150.48 175.77 0 top
NOREF#331  -  []  190.6 233.69 90 top
NOREF#332  -  []  168.42 261.77 0 top
NOREF#333  -  []  191.53 173.37 90 top
NOREF#334  -  []  164.44 232.28 90 top
NOREF#335  -  []  243.84 268.62 0 top
NOREF#336  -  []  277.03 178.07 0 top
NOREF#337  -  []  132.26 237.5 0 top
NOREF#338  -  []  203.84 273.41 90 top
NOREF#339  -  []  232.51 175.77 0 top
NOREF#340  -  []  253.65 179.15 0 top
NOREF#341  -  []  151.71 231.3 0 top
NOREF#342  -  []  195.56 175.77 0 top
NOREF#343  -  []  276.52 225.69 0 top
NOREF#344  -  []  227.3 280.35 0 top
NOREF#345  -  []  231.71 171.3 0 top
NOREF#346  -  []  180.95 201.55 90 top
NOREF#347  -  []  243.97 272 0 top
NOREF#348  -  []  220.83 261.22 90 top
NOREF#349  -  []  279.27 201.77 0 top
NOREF#350  -  []  233.56 233.37 90 top
NOREF#351  -  []  148.78 244.35 0 top
NOREF#352  -  []  140.95 204.09 90 top
NOREF#353  -  []  142.03 289.03 90 top
NOREF#354  -  []  172.87 227.4 90 top
NOREF#355  -  []  178.95 264.09 0 top
NOREF#356  -  []  162.2 178.35 0 top
NOREF#357  -  []  269.24 245.31 90 top
NOREF#358  -  []  216 396.29 0 top
NOREF#359  -  []  223.89 185.24 90 top
NOREF#360  -  []  200.23 236.17 90 top
NOREF#361  -  []  256.83 287.03 0 top
NOREF#362  -  []  237.04 244.35 0 top
NOREF#363  -  []  148.78 184.35 0 top
NOREF#364  -  []  199.4 273.09 90 top
NOREF#365  -  []  233.6 222.39 0 top
NOREF#366  -  []  231.79 196.75 0 top
NOREF#367  -  []  283.84 271.67 0 top
NOREF#368  -  []  155.05 278.82 0 top
NOREF#369  -  []  191.79 256.75 0 top
NOREF#370  -  []  180.95 266.12 90 top
NOREF#371  -  []  228.78 244.35 0 top
NOREF#372  -  []  276.45 187.71 0 top
NOREF#373  -  []  127.95 226.12 90 top
NOREF#374  -  []  114.62 458.49 0 top
NOREF#375  -  []  159.27 273.41 90 top
NOREF#376  -  []  283.84 200.97 90 top
NOREF#377  -  []  155.17 212.18 90 top
NOREF#378  -  []  270.6 233.69 90 top
NOREF#379  -  []  273.27 258.18 0 top
NOREF#380  -  []  150.77 283.79 90 top
NOREF#381  -  []  261.59 248.12 0 top
NOREF#382  -  []  149.21 17.15 0 top
NOREF#383  -  []  193.39 193.03 90 top
NOREF#384  -  []  249.52 200.42 90 top
NOREF#385  -  []  252.87 287.4 90 top
NOREF#386  -  []  271.79 191.93 0 top
NOREF#387  -  []  276.54 167 0 top
NOREF#388  -  []  273.76 255.7 90 top
NOREF#389  -  []  199.65 272.56 0 top
NOREF#390  -  []  192.87 248.11 90 top
NOREF#391  -  []  197.04 184.35 0 top
NOREF#392  -  []  153.27 198.18 0 top
NOREF#393  -  []  95.35 396.29 0 top
NOREF#394  -  []  211.05 185.49 90 top
NOREF#395  -  []  193.76 255.7 90 top
NOREF#396  -  []  184.16 256.43 90 top
NOREF#397  -  []  154.39 226.59 90 top
NOREF#398  -  []  208.54 208.95 0 top
NOREF#399  -  []  279.4 205.9 0 top
NOREF#400  -  []  151.79 191.93 0 top
NOREF#401  -  []  271.11 253.35 0 top
NOREF#402  -  []  246.32 274.76 0 top
NOREF#403  -  []  268.35 223.79 90 top
NOREF#404  -  []  284.95 204.23 90 top
NOREF#405  -  []  279.44 179.15 0 top
NOREF#406  -  []  124.55 148.49 90 top
NOREF#407  -  []  151.98 220.75 90 top
NOREF#408  -  []  237.71 233.69 0 top
NOREF#409  -  []  225 456.29 0 top
NOREF#410  -  []  231.18 179.15 0 top
NOREF#411  -  []  225.41 286.99 90 top
NOREF#412  -  []  231.95 238.07 0 top
NOREF#413  -  []  159.44 179.15 0 top
NOREF#414  -  []  267.3 226.19 0 top
NOREF#415  -  []  130.02 274.45 0 top
NOREF#416  -  []  187.43 278.27 0 top
NOREF#417  -  []  196.57 198.18 0 top
NOREF#418  -  []  271.95 178.07 0 top
NOREF#419  -  []  196.57 245.63 0 top
NOREF#420  -  []  245.38 286.23 0 top
NOREF#421  -  []  119.46 18.69 90 top
NOREF#422  -  []  259.08 263.76 0 top
NOREF#423  -  []  146.01 190.88 90 top
NOREF#424  -  []  139.08 265.79 0 top
NOREF#425  -  []  204.95 212.86 90 top
NOREF#426  -  []  281.75 274.76 0 top
NOREF#427  -  []  259.08 261.22 0 top
NOREF#428  -  []  272.25 218.02 0 top
NOREF#429  -  []  165.04 233.3 90 top
NOREF#430  -  []  188.99 196.75 0 top
NOREF#431  -  []  307.65 17.78 0 top
NOREF#432  -  []  136.5 271.94 0 top
NOREF#433  -  []  255.24 201.55 90 top
NOREF#434  -  []  248.54 267.5 90 top
NOREF#435  -  []  203.97 207.5 90 top
NOREF#436  -  []  164.95 260.42 90 top
NOREF#437  -  []  214.38 264.09 0 top
NOREF#438  -  []  276.8 274.65 90 top
NOREF#439  -  []  173.64 299.09 0 top
NOREF#440  -  []  283.84 204.78 90 top
NOREF#441  -  []  288.54 202.09 0 top
NOREF#442  -  []  277.92 250.01 0 top
NOREF#443  -  []  229.24 245.31 90 top
NOREF#444  -  []  147.03 231.4 0 top
NOREF#445  -  []  164.61 294.24 90 top
NOREF#446  -  []  156.61 173.37 90 top
NOREF#447  -  []  235.17 281.32 0 top
NOREF#448  -  []  157.8 14.59 90 top
NOREF#449  -  []  231.53 233.37 90 top
NOREF#450  -  []  260.95 204.09 90 top
NOREF#451  -  []  212.55 224.49 0 top
NOREF#452  -  []  163.84 260.97 90 top
NOREF#453  -  []  242.85 237.22 0 top
NOREF#454  -  []  163.92 229.94 0 top
NOREF#455  -  []  159.22 179.57 90 top
NOREF#456  -  []  199.4 212 0 top
NOREF#457  -  []  157.71 173.69 0 top
NOREF#458  -  []  258.95 266.12 0 top
NOREF#459  -  []  196.38 181.15 90 top
NOREF#460  -  []  237.37 180.3 90 top
NOREF#461  -  []  228.44 253.03 90 top
NOREF#462  -  []  273.76 190.88 90 top
NOREF#463  -  []  163.97 210.55 90 top
NOREF#464  -  []  269.84 224.11 90 top
NOREF#465  -  []  215.59 16.49 0 top
NOREF#466  -  []  273.76 195.7 90 top
NOREF#467  -  []  156.02 197.6 0 top
NOREF#468  -  []  203.04 236.5 90 top
NOREF#469  -  []  154.63 277.85 0 top
NOREF#470  -  []  188.32 245.63 0 top
NOREF#471  -  []  138.95 268.91 0 top
NOREF#472  -  []  258.95 268.91 0 top
NOREF#473  -  []  187.99 178.35 0 top
NOREF#474  -  []  199.4 207.5 90 top
NOREF#475  -  []  193.76 195.7 90 top
NOREF#476  -  []  156.79 231.3 0 top
NOREF#477  -  []  134.43 232.23 0 top
NOREF#478  -  []  143.49 253.03 90 top
NOREF#479  -  []  106.68 148.34 90 top
NOREF#480  -  []  276.02 192.78 0 top
NOREF#481  -  []  196.54 227 0 top
NOREF#482  -  []  239.27 201.77 0 top
NOREF#483  -  []  233.76 190.88 90 top
NOREF#484  -  []  186.16 258.18 0 top
NOREF#485  -  []  157.25 240.62 0 top
NOREF#486  -  []  271.91 256.43 90 top
NOREF#487  -  []  262.81 246.81 0 top
NOREF#488  -  []  151.53 233.37 90 top
NOREF#489  -  []  243.84 210.87 90 top
NOREF#490  -  []  201.75 209.17 0 top
NOREF#491  -  []  154.62 247.68 90 top
NOREF#492  -  []  218.35 209.04 0 top
NOREF#493  -  []  260.83 205.79 90 top
NOREF#494  -  []  243.97 202.09 0 top
NOREF#495  -  []  156.54 227 0 top
NOREF#496  -  []  133.62 229.09 90 top
NOREF#497  -  []  193.98 238.07 0 top
NOREF#498  -  []  138.75 457.2 0 top
NOREF#499  -  []  261.55 267.14 90 top
NOREF#500  -  []  184.04 191.93 0 top
NOREF#501  -  []  196.57 193.35 0 top
NOREF#502  -  []  269.12 240.3 90 top
NOREF#503  -  []  232.25 278.02 0 top
NOREF#504  -  []  147.9 205.84 90 top
NOREF#505  -  []  288.42 208.62 0 top
NOREF#506  -  []  205.04 233.3 90 top
NOREF#507  -  []  237.59 175.77 0 top
NOREF#508  -  []  186.96 196.43 90 top
NOREF#509  -  []  254.43 232.23 0 top
NOREF#510  -  []  241.75 212.22 0 top
NOREF#511  -  []  277.37 240.3 90 top
NOREF#512  -  []  229.84 273.7 90 top
NOREF#513  -  []  266.01 244.91 90 top
NOREF#514  -  []  281.75 214.76 0 top
NOREF#515  -  []  154.63 286.99 0 top
NOREF#516  -  []  242.2 238.35 0 top
NOREF#517  -  []  209.52 200.42 90 top
NOREF#518  -  []  267.8 269.99 0 top
NOREF#519  -  []  156.57 258.18 0 top
NOREF#520  -  []  189.72 221.62 0 top
NOREF#521  -  []  145.61 254.08 0 top
NOREF#522  -  []  226.96 191.6 90 top
NOREF#523  -  []  196.45 247.71 0 top
NOREF#524  -  []  239.4 204.45 90 top
NOREF#525  -  []  152.66 226.35 90 top
NOREF#526  -  []  236.54 227 0 top
NOREF#527  -  []  275.68 233.69 90 top
NOREF#528  -  []  219.73 238.35 0 top
NOREF#529  -  []  253.65 239.15 0 top
NOREF#530  -  []  283.97 264.45 90 top
NOREF#531  -  []  152.87 188.11 90 top
NOREF#532  -  []  243.97 264.45 90 top
NOREF#533  -  []  282.26 176.17 90 top
NOREF#534  -  []  125.08 17.15 90 top
NOREF#535  -  []  203.84 271.67 0 top
NOREF#536  -  []  271.98 286.59 90 top
NOREF#537  -  []  189.12 196.43 90 top
NOREF#538  -  []  183.36 193.35 0 top
NOREF#539  -  []  137.28 286.47 0 top
NOREF#540  -  []  244.61 234.89 90 top
NOREF#541  -  []  189.84 213.7 90 top
NOREF#542  -  []  124.44 232.28 90 top
NOREF#543  -  []  182.81 197.6 0 top
NOREF#544  -  []  287.25 19.69 90 top
NOREF#545  -  []  284.95 264.23 90 top
NOREF#546  -  []  151.11 253.35 0 top
NOREF#547  -  []  186.28 253.03 90 top
NOREF#548  -  []  124.61 294.89 90 top
NOREF#549  -  []  249.05 232.28 0 top
NOREF#550  -  []  235.68 173.69 0 top
NOREF#551  -  []  279.72 279.22 90 top
NOREF#552  -  []  235.05 283.39 0 top
NOREF#553  -  []  227.77 241.47 0 top
NOREF#554  -  []  284.64 241.15 90 top
NOREF#555  -  []  182.87 286.99 0 top
NOREF#556  -  []  168.94 281.73 0 top
NOREF#557  -  []  155.58 202.67 90 top
NOREF#558  -  []  260.43 284.38 90 top
NOREF#559  -  []  156.57 242.05 0 top
NOREF#560  -  []  147.8 265.39 90 top
NOREF#561  -  []  268.81 255.7 90 top
NOREF#562  -  []  138.95 266.12 0 top
NOREF#563  -  []  268.99 180.62 0 top
NOREF#564  -  []  236.81 232.54 0 top
NOREF#565  -  []  225.09 197.49 90 top
NOREF#566  -  []  220.83 265.79 90 top
NOREF#567  -  []  220.59 244.98 90 top
NOREF#568  -  []  240.13 456.29 0 top
NOREF#569  -  []  236.02 181.47 0 top
NOREF#570  -  []  95.33 18.69 0 top
NOREF#571  -  []  234.39 276.17 90 top
NOREF#572  -  []  197.59 235.77 0 top
NOREF#573  -  []  170.02 214.45 0 top
NOREF#574  -  []  215.84 202.57 90 top
NOREF#575  -  []  153.18 217.69 90 top
NOREF#576  -  []  161.75 272.22 0 top
NOREF#577  -  []  138.95 261.55 0 top
NOREF#578  -  []  279.27 264.78 90 top
NOREF#579  -  []  268.95 266.89 0 top
NOREF#580  -  []  207.95 286.12 90 top
NOREF#581  -  []  204.95 260.42 90 top
NOREF#582  -  []  150.77 213.37 90 top
NOREF#583  -  []  191.24 193.03 90 top
NOREF#584  -  []  155.17 272.17 90 top
NOREF#585  -  []  189.12 180.3 90 top
NOREF#586  -  []  176.74 456.29 0 top
NOREF#587  -  []  227.8 204.99 90 top
NOREF#588  -  []  146.43 222.5 90 top
NOREF#589  -  []  229.84 273.7 0 top
NOREF#590  -  []  157.92 252.5 90 top
NOREF#591  -  []  203.84 201.77 0 top
NOREF#592  -  []  180.43 284.38 90 top
NOREF#593  -  []  155.15 236.17 90 top
NOREF#594  -  []  155.17 221.32 0 top
NOREF#595  -  []  235.17 216.75 0 top
NOREF#596  -  []  175.02 208.14 90 top
NOREF#597  -  []  186.01 250.88 90 top
NOREF#598  -  []  228.35 217.95 90 top
NOREF#599  -  []  277.18 176.17 90 top
NOREF#600  -  []  171.05 185.49 90 top
NOREF#601  -  []  228.78 244.35 0 top
NOREF#602  -  []  277.37 180.3 90 top
NOREF#603  -  []  232.11 171.4 0 top
NOREF#604  -  []  203.97 272 0 top
NOREF#605  -  []  199.72 214.65 90 top
NOREF#606  -  []  155.68 173.69 0 top
NOREF#607  -  []  244.76 392.33 90 top
NOREF#608  -  []  203.97 267.5 90 top
NOREF#609  -  []  262.87 213.02 0 top
NOREF#610  -  []  188.81 255.7 90 top
NOREF#611  -  []  284.95 272.86 90 top
NOREF#612  -  []  196.57 245.63 90 top
NOREF#613  -  []  162.57 231.95 0 top
NOREF#614  -  []  174.09 267.27 90 top
NOREF#615  -  []  209.55 237.49 90 top
NOREF#616  -  []  152.25 222.59 90 top
NOREF#617  -  []  178.35 211.84 0 top
NOREF#618  -  []  279.27 214.21 0 top
NOREF#619  -  []  243.84 267.82 90 top
NOREF#620  -  []  170.92 291.95 90 top
NOREF#621  -  []  271.19 278.07 0 top
NOREF#622  -  []  216.38 204.09 90 top
NOREF#623  -  []  276.57 253.35 0 top
NOREF#624  -  []  156.02 248.11 90 top
NOREF#625  -  []  182.03 289.03 90 top
NOREF#626  -  []  275.17 272.17 0 top
NOREF#627  -  []  141.55 209.94 90 top
NOREF#628  -  []  234.78 236.5 90 top
NOREF#629  -  []  106.68 128.02 90 top
NOREF#630  -  []  206.32 206.13 0 top
NOREF#631  -  []  156.02 181.47 0 top
NOREF#632  -  []  267.8 264.99 90 top
NOREF#633  -  []  278.13 389.27 90 top
NOREF#634  -  []  279.27 210.87 90 top
NOREF#635  -  []  187.99 238.35 0 top
NOREF#636  -  []  215.65 244.35 0 top
NOREF#637  -  []  129.05 292.28 0 top
NOREF#638  -  []  264.16 191.6 90 top
NOREF#639  -  []  172.55 190.49 90 top
NOREF#640  -  []  201.84 235.2 0 top
NOREF#641  -  []  235.05 274.25 0 top
NOREF#642  -  []  239.4 260.64 90 top
NOREF#643  -  []  279.4 200.64 90 top
NOREF#644  -  []  171.05 232.28 90 top
NOREF#645  -  []  267.8 205.39 90 top
NOREF#646  -  []  236.38 181.15 90 top
NOREF#647  -  []  215.11 201.22 90 top
NOREF#648  -  []  140.95 208.91 90 top
NOREF#649  -  []  196.1 276.42 90 top
NOREF#650  -  []  263.49 197.85 90 top
NOREF#651  -  []  229.12 191.6 90 top
NOREF#652  -  []  221.59 248.12 0 top
NOREF#653  -  []  186.83 196.75 0 top
NOREF#654  -  []  128.94 221.73 0 top
NOREF#655  -  []  236.79 231.3 0 top
NOREF#656  -  []  188.44 241.72 90 top
NOREF#657  -  []  154.07 251.6 90 top
NOREF#658  -  []  179.08 261.22 0 top
NOREF#659  -  []  274.39 222.02 90 top
NOREF#660  -  []  248.42 204.78 90 top
NOREF#661  -  []  214.09 260.42 90 top
NOREF#662  -  []  186.16 198.18 0 top
NOREF#663  -  []  289.52 212.86 90 top
NOREF#664  -  []  284.95 207.27 90 top
NOREF#665  -  []  208.42 205.58 0 top
NOREF#666  -  []  148.24 392.33 90 top
NOREF#667  -  []  227.03 231.4 0 top
NOREF#668  -  []  147.43 284.11 0 top
NOREF#669  -  []  186.01 255.7 90 top
NOREF#670  -  []  228.81 250.88 90 top
NOREF#671  -  []  253.45 184.35 0 top
NOREF#672  -  []  233.6 282.39 0 top
NOREF#673  -  []  228.99 251.93 0 top
NOREF#674  -  []  178.85 181.15 90 top
NOREF#675  -  []  193.27 193.35 0 top
NOREF#676  -  []  153.95 196.75 0 top
NOREF#677  -  []  174.38 264.09 0 top
NOREF#678  -  []  201.12 188.11 90 top
NOREF#679  -  []  276.52 285.69 0 top
NOREF#680  -  []  236.8 225.06 90 top
NOREF#681  -  []  226.16 286.14 90 top
NOREF#682  -  []  195.17 281.32 90 top
NOREF#683  -  []  220.95 268.91 90 top
NOREF#684  -  []  237.18 176.17 90 top
NOREF#685  -  []  219.72 273.6 90 top
NOREF#686  -  []  300.14 320.9 0 top
NOREF#687  -  []  156.7 197.85 90 top
NOREF#688  -  []  176.98 265.11 90 top
NOREF#689  -  []  216.55 254.49 90 top
NOREF#690  -  []  197.37 196.43 90 top
NOREF#691  -  []  182.81 246.81 0 top
NOREF#692  -  []  239.4 208.95 0 top
NOREF#693  -  []  192.13 284.66 0 top
NOREF#694  -  []  191.11 198.18 0 top
NOREF#695  -  []  245.04 233.3 90 top
NOREF#696  -  []  190.6 173.69 90 top
NOREF#697  -  []  271.19 218.07 0 top
NOREF#698  -  []  148.32 185.63 90 top
NOREF#699  -  []  150.97 190.88 90 top
NOREF#700  -  []  202.44 232.28 0 top
NOREF#701  -  []  194.33 264.33 90 top
NOREF#702  -  []  239.27 213.41 90 top
NOREF#703  -  []  276.8 220.49 90 top
NOREF#704  -  []  192.25 218.02 90 top
NOREF#705  -  []  138.85 181.15 90 top
NOREF#706  -  []  133.95 281.02 90 top
NOREF#707  -  []  267.99 178.35 0 top
NOREF#708  -  []  151.91 196.43 90 top
NOREF#709  -  []  270.56 252.78 0 top
NOREF#710  -  []  134.04 210.63 90 top
NOREF#711  -  []  239.4 212 0 top
NOREF#712  -  []  218.85 241.15 90 top
NOREF#713  -  []  235.17 276.75 0 top
NOREF#714  -  []  208.42 267.82 90 top
NOREF#715  -  []  215.24 261.55 90 top
NOREF#716  -  []  239.27 200.97 90 top
NOREF#717  -  []  267.43 278.27 90 top
NOREF#718  -  []  271.11 198.18 0 top
NOREF#719  -  []  191.11 258.18 0 top
NOREF#720  -  []  150.56 252.5 0 top
NOREF#721  -  []  211.65 293.3 90 top
NOREF#722  -  []  135.84 202.57 90 top
NOREF#723  -  []  199.4 267.5 90 top
NOREF#724  -  []  191.19 283.92 0 top
NOREF#725  -  []  195.56 235.77 0 top
NOREF#726  -  []  265.61 257.6 0 top
NOREF#727  -  []  148.32 245.63 90 top
NOREF#728  -  []  219.08 263.76 0 top
NOREF#729  -  []  194.39 286.59 90 top
NOREF#730  -  []  134.38 204.09 0 top
NOREF#731  -  []  223.49 257.85 90 top
NOREF#732  -  []  272.25 222.59 0 top
NOREF#733  -  []  203.84 204.78 90 top
NOREF#734  -  []  270.97 190.88 90 top
NOREF#735  -  []  272.72 252.78 0 top
NOREF#736  -  []  149.84 224.11 0 top
NOREF#737  -  []  221.85 232.5 0 top
NOREF#738  -  []  241.75 262.32 0 top
NOREF#739  -  []  268.44 241.72 90 top
NOREF#740  -  []  236.8 214.65 90 top
NOREF#741  -  []  157.92 236.37 90 top
NOREF#742  -  []  157.71 172.86 0 top
NOREF#743  -  []  277.37 191.6 90 top
NOREF#744  -  []  275.17 281.32 90 top
NOREF#745  -  []  208.54 265.9 0 top
NOREF#746  -  []  188.99 251.93 0 top
NOREF#747  -  []  214.07 210.89 90 top
NOREF#748  -  []  95.33 20.69 90 top
NOREF#749  -  []  273.18 244.35 0 top
NOREF#750  -  []  288.42 205.58 0 top
NOREF#751  -  []  233.39 197.85 90 top
NOREF#752  -  []  283.84 274.21 0 top
NOREF#753  -  []  268.81 195.7 90 top
NOREF#754  -  []  203.1 18.69 90 top
NOREF#755  -  []  221.85 292.49 0 top
NOREF#756  -  []  134.43 292.23 0 top
NOREF#757  -  []  109.54 14.59 90 top
NOREF#758  -  []  232.25 278.02 90 top
NOREF#759  -  []  262.81 186.81 0 top
NOREF#760  -  []  148.81 195.7 90 top
NOREF#761  -  []  213.24 261.55 0 top
NOREF#762  -  []  279.4 202.09 0 top
NOREF#763  -  []  155.68 233.69 0 top
NOREF#764  -  []  230.97 255.7 90 top
NOREF#765  -  []  232.63 232.86 0 top
NOREF#766  -  []  175.65 244.35 0 top
NOREF#767  -  []  249.52 267.27 90 top
NOREF#768  -  []  100.95 17.15 0 top
NOREF#769  -  []  232.11 231.4 0 top
NOREF#770  -  []  197.74 226.35 90 top
NOREF#771  -  []  240.13 396.29 0 top
NOREF#772  -  []  276.1 276.42 90 top
NOREF#773  -  []  268.32 245.63 90 top
NOREF#774  -  []  279.4 268.95 0 top
NOREF#775  -  []  251.05 292.28 90 top
NOREF#776  -  []  151.7 274.65 90 top
NOREF#777  -  []  186.7 283.04 90 top
NOREF#778  -  []  279.72 274.65 90 top
NOREF#779  -  []  222.81 252.78 0 top
NOREF#780  -  []  261.03 267.69 90 top
NOREF#781  -  []  208.42 208.62 0 top
NOREF#782  -  []  222.81 197.6 0 top
NOREF#783  -  []  109.55 389.27 90 top
NOREF#784  -  []  153.18 282.26 90 top
NOREF#785  -  []  226.28 193.03 90 top
NOREF#786  -  []  260.95 266.12 90 top
NOREF#787  -  []  233.56 173.37 90 top
NOREF#788  -  []  227.43 224.11 90 top
NOREF#789  -  []  189.24 245.31 90 top
NOREF#790  -  []  237.71 232.86 0 top
NOREF#791  -  []  159.4 210.55 90 top
NOREF#792  -  []  254.38 204.09 0 top
NOREF#793  -  []  189.84 219.54 90 top
NOREF#794  -  []  190.77 273.37 90 top
NOREF#795  -  []  271.46 227 0 top
NOREF#796  -  []  151.95 178.07 0 top
NOREF#797  -  []  269.84 273.7 0 top
NOREF#798  -  []  156.33 227.9 90 top
NOREF#799  -  []  239.4 265.9 0 top
NOREF#800  -  []  178.97 271.91 90 top
NOREF#801  -  []  137.28 272.5 0 top
NOREF#802  -  []  218.95 266.12 0 top
NOREF#803  -  []  243.92 229.94 0 top
NOREF#804  -  []  163.84 214.21 0 top
NOREF#805  -  []  259.55 294.49 0 top
NOREF#806  -  []  181.94 389.27 90 top
NOREF#807  -  []  90.49 457.2 0 top
NOREF#808  -  []  195.15 236.17 90 top
NOREF#809  -  []  241.75 274.76 0 top
NOREF#810  -  []  167.74 396.29 0 top
NOREF#811  -  []  210.89 269.17 0 top
NOREF#812  -  []  174.09 200.42 90 top
NOREF#813  -  []  147.43 224.11 90 top
NOREF#814  -  []  189.12 240.3 90 top
NOREF#815  -  []  204.44 292.28 90 top
NOREF#816  -  []  178.95 206.12 0 top
NOREF#817  -  []  202.2 238.35 0 top
NOREF#818  -  []  158.04 228.3 0 top
NOREF#819  -  []  272.66 166.36 90 top
NOREF#820  -  []  149.29 282.02 90 top
NOREF#821  -  []  188.99 240.62 0 top
NOREF#822  -  []  273.03 232.1 0 top
NOREF#823  -  []  148.99 180.62 0 top
NOREF#824  -  []  173.78 267.01 0 top
NOREF#825  -  []  276.7 257.85 90 top
NOREF#826  -  []  243.97 210.55 90 top
NOREF#827  -  []  143.36 193.35 0 top
NOREF#828  -  []  182.81 257.6 0 top
NOREF#829  -  []  279.4 274.54 0 top
NOREF#830  -  []  224.16 191.6 90 top
NOREF#831  -  []  135.15 265.24 0 top
NOREF#832  -  []  187.3 226.19 0 top
NOREF#833  -  []  199.27 264.78 90 top
NOREF#834  -  []  276.33 167.9 90 top
NOREF#835  -  []  196.1 271.85 90 top
NOREF#836  -  []  236.7 181.72 90 top
NOREF#837  -  []  203.84 260.97 90 top
NOREF#838  -  []  197.25 191.93 0 top
NOREF#839  -  []  106.68 128.02 0 top
NOREF#840  -  []  147.43 218.27 0 top
NOREF#841  -  []  178.35 269.04 0 top
NOREF#842  -  []  168.54 262.09 0 top
NOREF#843  -  []  264.04 251.93 0 top
NOREF#844  -  []  167.74 456.29 0 top
NOREF#845  -  []  182.87 226.99 0 top
NOREF#846  -  []  174.04 270.63 90 top
NOREF#847  -  []  159.24 244.35 0 top
NOREF#848  -  []  193.03 232.1 0 top
NOREF#849  -  []  231.46 227 0 top
NOREF#850  -  []  268.99 196.75 0 top
NOREF#851  -  []  273.83 172.21 90 top
NOREF#852  -  []  184.16 245.63 90 top
NOREF#853  -  []  236.02 197.6 0 top
NOREF#854  -  []  88.44 107.76 0 top
NOREF#855  -  []  148.44 181.72 90 top
NOREF#856  -  []  288.54 267.5 90 top
NOREF#857  -  []  281.75 212.22 0 top
NOREF#858  -  []  161.84 235.2 0 top
NOREF#859  -  []  235.17 212.18 90 top
NOREF#860  -  []  224.04 185.96 0 top
NOREF#861  -  []  199.27 208.62 0 top
NOREF#862  -  []  148.44 241.72 90 top
NOREF#863  -  []  177.25 236.5 90 top
NOREF#864  -  []  164.95 204.23 90 top
NOREF#865  -  []  190.77 283.79 90 top
NOREF#866  -  []  188.95 206.89 0 top
NOREF#867  -  []  237.74 226.35 90 top
NOREF#868  -  []  247.95 286.12 90 top
NOREF#869  -  []  193.6 286.96 0 top
NOREF#870  -  []  276.8 285.06 90 top
NOREF#871  -  []  194.39 276.17 90 top
NOREF#872  -  []  163.97 207.5 90 top
NOREF#873  -  []  135.66 244.35 0 top
NOREF#874  -  []  209.55 237.49 0 top
NOREF#875  -  []  225.61 252.78 0 top
NOREF#876  -  []  203.84 264.78 90 top
NOREF#877  -  []  173.64 239.09 0 top
NOREF#878  -  []  227.43 278.27 90 top
NOREF#879  -  []  276.52 281.12 0 top
NOREF#880  -  []  142.81 197.6 0 top
NOREF#881  -  []  269.72 226.19 0 top
NOREF#882  -  []  233.03 232.1 0 top
NOREF#883  -  []  171.22 294.24 90 top
NOREF#884  -  []  169.49 220.89 0 top
NOREF#885  -  []  264.26 456.29 0 top
NOREF#886  -  []  258.97 211.91 90 top
NOREF#887  -  []  159.27 214.21 0 top
NOREF#888  -  []  229.84 224.11 0 top
NOREF#889  -  []  130.58 263.21 0 top
NOREF#890  -  []  161.12 188.11 90 top
NOREF#891  -  []  279.4 213.09 90 top
NOREF#892  -  []  146.83 251.93 0 top
NOREF#893  -  []  147.8 204.99 90 top
NOREF#894  -  []  193.95 196.75 0 top
NOREF#895  -  []  210.89 262.32 0 top
NOREF#896  -  []  166.32 272.22 0 top
NOREF#897  -  []  268.78 244.35 0 top
NOREF#898  -  []  172.87 287.4 90 top
NOREF#899  -  []  157.04 244.35 0 top
NOREF#900  -  []  226.96 251.6 90 top
NOREF#901  -  []  268.32 253.35 0 top
NOREF#902  -  []  283.97 272 0 top
NOREF#903  -  []  219.55 180.49 90 top
NOREF#904  -  []  266.28 253.03 90 top
NOREF#905  -  []  86.61 153.16 0 top
NOREF#906  -  []  268.78 184.35 0 top
NOREF#907  -  []  193.6 276.55 0 top
NOREF#908  -  []  208.54 204.45 90 top
NOREF#909  -  []  163.97 273.09 90 top
NOREF#910  -  []  258.95 201.55 0 top
NOREF#911  -  []  211.25 184.35 0 top
NOREF#912  -  []  246.32 272.22 0 top
NOREF#913  -  []  158.11 232.1 0 top
NOREF#914  -  []  176.26 263.76 90 top
NOREF#915  -  []  275.17 221.32 0 top
NOREF#916  -  []  251.05 245.49 90 top
NOREF#917  -  []  147.9 265.84 90 top
NOREF#918  -  []  125.25 291.4 90 top
NOREF#919  -  []  129.49 266.31 0 top
NOREF#920  -  []  270.97 239.57 90 top
NOREF#921  -  []  274.39 286.59 90 top
NOREF#922  -  []  201.41 167.9 90 top
NOREF#923  -  []  163.84 274.21 0 top
NOREF#924  -  []  140.83 268.59 90 top
NOREF#925  -  []  173.45 244.35 0 top
NOREF#926  -  []  197.59 175.77 0 top
NOREF#927  -  []  271.98 220.75 90 top
NOREF#928  -  []  178.35 267.01 0 top
NOREF#929  -  []  95.35 456.29 90 top
NOREF#930  -  []  279.27 213.41 90 top
NOREF#931  -  []  226.16 226.14 90 top
NOREF#932  -  []  218.35 271.84 0 top
NOREF#933  -  []  193.83 232.21 90 top
NOREF#934  -  []  227.43 284.11 0 top
NOREF#935  -  []  271.73 172.54 0 top
NOREF#936  -  []  275.15 236.17 90 top
NOREF#937  -  []  151.11 193.35 0 top
NOREF#938  -  []  258.85 181.15 90 top
NOREF#939  -  []  275.17 221.32 90 top
NOREF#940  -  []  186.96 256.43 90 top
NOREF#941  -  []  208.54 262.09 0 top
NOREF#942  -  []  224.16 251.6 90 top
NOREF#943  -  []  249.52 207.27 90 top
NOREF#944  -  []  143.61 456.29 90 top
NOREF#945  -  []  149.24 185.31 90 top
NOREF#946  -  []  163.84 208.62 0 top
NOREF#947  -  []  93.68 156.59 0 top
NOREF#948  -  []  283.97 202.09 0 top
NOREF#949  -  []  156.7 253.03 90 top
NOREF#950  -  []  248.42 207.82 90 top
NOREF#951  -  []  260.95 208.91 90 top
NOREF#952  -  []  254.38 264.09 0 top
NOREF#953  -  []  247.95 226.12 90 top
NOREF#954  -  []  159.4 272 0 top
NOREF#955  -  []  199.27 211.67 0 top
NOREF#956  -  []  267.43 284.11 0 top
NOREF#957  -  []  251.05 232.28 90 top
NOREF#958  -  []  253.45 244.35 0 top
NOREF#959  -  []  179.73 238.35 0 top
NOREF#960  -  []  236.52 216.55 0 top
NOREF#961  -  []  199.27 201.77 0 top
NOREF#962  -  []  197.47 17.15 90 top
NOREF#963  -  []  148.99 191.93 0 top
NOREF#964  -  []  243.97 267.5 90 top
NOREF#965  -  []  243.04 176.5 90 top
NOREF#966  -  []  236.8 280.49 90 top
NOREF#967  -  []  275.05 218.82 0 top
NOREF#968  -  []  156.81 172.54 0 top
NOREF#969  -  []  133.62 289.09 90 top
NOREF#970  -  []  283.84 201.77 0 top
NOREF#971  -  []  197.37 191.6 90 top
NOREF#972  -  []  229.72 221.62 0 top
NOREF#973  -  []  279.72 214.65 90 top
NOREF#974  -  []  273.39 193.03 90 top
NOREF#975  -  []  175.84 202.57 90 top
NOREF#976  -  []  121.84 235.2 0 top
NOREF#977  -  []  188.81 250.88 90 top
NOREF#978  -  []  209.05 232.28 0 top
NOREF#979  -  []  256.26 203.76 90 top
NOREF#980  -  []  163.4 296.38 0 top
NOREF#981  -  []  144.16 196.43 90 top
NOREF#982  -  []  283.97 213.09 90 top
NOREF#983  -  []  233.18 271.85 90 top
NOREF#984  -  []  124.61 294.24 90 top
NOREF#985  -  []  274.39 226.59 90 top
NOREF#986  -  []  220.83 263.76 90 top
NOREF#987  -  []  139.08 263.76 0 top
NOREF#988  -  []  133.24 261.55 0 top
NOREF#989  -  []  178.85 241.15 90 top
NOREF#990  -  []  231.19 283.92 0 top
NOREF#991  -  []  267.77 181.47 0 top
NOREF#992  -  []  208.54 207.5 90 top
NOREF#993  -  []  135.24 261.55 90 top
NOREF#994  -  []  244.95 272.86 90 top
NOREF#995  -  []  233.94 191.93 0 top
NOREF#996  -  []  148.35 223.79 90 top
NOREF#997  -  []  219.08 265.79 0 top
NOREF#998  -  []  237.03 238.07 0 top
NOREF#999  -  []  140.95 268.91 90 top
NOREF#1000  -  []  260.95 264.09 90 top
NOREF#1001  -  []  193.6 282.39 0 top
NOREF#1002  -  []  233.98 238.07 0 top
NOREF#1003  -  []  277.59 175.77 0 top
NOREF#1004  -  []  253.36 201.22 0 top
NOREF#1005  -  []  192.25 282.59 0 top
NOREF#1006  -  []  0 382.27 0 top
NOREF#1007  -  []  192.11 171.4 0 top
NOREF#1008  -  []  312.52 456.29 0 top
NOREF#1009  -  []  151.7 285.06 90 top
NOREF#1010  -  []  274.33 267.37 90 top
NOREF#1011  -  []  209.49 220.89 0 top
NOREF#1012  -  []  196.84 227.33 0 top
NOREF#1013  -  []  206.32 212.22 0 top
NOREF#1014  -  []  236.8 220.49 90 top
NOREF#1015  -  []  146.17 286.14 90 top
NOREF#1016  -  []  192.63 232.86 0 top
NOREF#1017  -  []  253.62 289.09 90 top
NOREF#1018  -  []  202.2 178.35 0 top
NOREF#1019  -  []  239.27 268.62 0 top
NOREF#1020  -  []  203.97 213.09 90 top
NOREF#1021  -  []  157.04 184.35 0 top
NOREF#1022  -  []  189.55 188.99 90 top
NOREF#1023  -  []  294.09 207.27 90 top
NOREF#1024  -  []  146.83 191.93 0 top
NOREF#1025  -  []  283.97 208.95 0 top
NOREF#1026  -  []  191.53 233.37 90 top
NOREF#1027  -  []  154.39 216.17 90 top
NOREF#1028  -  []  163.84 207.82 90 top
NOREF#1029  -  []  189.84 284.11 90 top
NOREF#1030  -  []  275.68 233.69 0 top
NOREF#1031  -  []  149.29 285.22 0 top
NOREF#1032  -  []  187.8 269.99 0 top
NOREF#1033  -  []  243.97 207.5 90 top
NOREF#1034  -  []  144.04 245.96 0 top
NOREF#1035  -  []  243.84 201.77 0 top
NOREF#1036  -  []  191.79 251.93 0 top
NOREF#1037  -  []  181.55 207.14 90 top
NOREF#1038  -  []  189.84 219.54 0 top
NOREF#1039  -  []  273.39 257.85 90 top
NOREF#1040  -  []  269.55 188.99 90 top
NOREF#1041  -  []  239.72 214.65 90 top
NOREF#1042  -  []  196.02 181.47 0 top
NOREF#1043  -  []  233.39 193.03 90 top
NOREF#1044  -  []  233.94 256.75 0 top
NOREF#1045  -  []  156.84 227.33 0 top
NOREF#1046  -  []  151.7 277.85 0 top
NOREF#1047  -  []  234.33 204.33 90 top
NOREF#1048  -  []  189.84 279.54 0 top
NOREF#1049  -  []  133.36 261.22 0 top
NOREF#1050  -  []  147.3 220.35 0 top
NOREF#1051  -  []  279.4 264.45 90 top
NOREF#1052  -  []  210.89 206.13 0 top
NOREF#1053  -  []  122.85 237.22 0 top
NOREF#1054  -  []  148.99 251.93 0 top
NOREF#1055  -  []  272.25 218.02 90 top
NOREF#1056  -  []  276.57 198.18 0 top
NOREF#1057  -  []  199.06 178.07 0 top
NOREF#1058  -  []  244.95 210.32 90 top
NOREF#1059  -  []  193.39 197.85 90 top
NOREF#1060  -  []  196.33 167.9 90 top
NOREF#1061  -  []  187.8 204.99 90 top
NOREF#1062  -  []  233.6 216.55 0 top
NOREF#1063  -  []  178.95 208.91 0 top
NOREF#1064  -  []  275.49 18.69 90 top
NOREF#1065  -  []  89.74 155.92 0 top
NOREF#1066  -  []  243.97 260.64 90 top
NOREF#1067  -  []  261.03 207.69 90 top
NOREF#1068  -  []  187.43 224.11 90 top
NOREF#1069  -  []  186.28 257.85 90 top
NOREF#1070  -  []  192.13 274.25 0 top
NOREF#1071  -  []  262.87 286.99 0 top
NOREF#1072  -  []  271.91 196.43 90 top
NOREF#1073  -  []  185.42 214.72 90 top
NOREF#1074  -  []  190.56 257.6 0 top
NOREF#1075  -  []  150.88 168.6 90 top
NOREF#1076  -  []  208.42 204.78 90 top
NOREF#1077  -  []  164.64 241.15 90 top
NOREF#1078  -  []  152.25 212.18 90 top
NOREF#1079  -  []  241.44 244.35 0 top
NOREF#1080  -  []  157.25 256.75 0 top
NOREF#1081  -  []  244.61 294.89 90 top
NOREF#1082  -  []  156.02 251.31 0 top
NOREF#1083  -  []  243.84 274.21 0 top
NOREF#1084  -  []  187.43 278.27 90 top
NOREF#1085  -  []  236.52 285.69 0 top
NOREF#1086  -  []  169.05 232.28 0 top
NOREF#1087  -  []  199.27 200.97 90 top
NOREF#1088  -  []  197.18 176.17 90 top
NOREF#1089  -  []  169.52 272.86 90 top
NOREF#1090  -  []  136.5 285.91 90 top
NOREF#1091  -  []  246.32 266.13 0 top
NOREF#1092  -  []  132.87 287.4 90 top
NOREF#1093  -  []  283.97 210.55 90 top
NOREF#1094  -  []  218.35 211.84 0 top
NOREF#1095  -  []  236.54 167 0 top
NOREF#1096  -  []  228.78 184.35 0 top
NOREF#1097  -  []  203.97 274.54 0 top
NOREF#1098  -  []  159.4 264.45 90 top
NOREF#1099  -  []  157.18 236.17 90 top
NOREF#1100  -  []  191.95 178.07 0 top
NOREF#1101  -  []  222.81 192.78 0 top
NOREF#1102  -  []  138.35 211.84 0 top
NOREF#1103  -  []  175.24 201.55 90 top
NOREF#1104  -  []  155.56 235.77 0 top
